# Altium PCB POD-Design-v1.0.PcbDoc (part 6 of 8)
Units mil, origin at the board's own origin, x right, y up, seen from the top; angles counter-clockwise.
Board outline 5511.81 x 3937.01 mil, 4 copper layers (Top Layer, Layer 1, Layer 2, Bottom Layer), stack 61.653 mil thick; 347 components, 252 nets, 1015 pads, 412 vias.
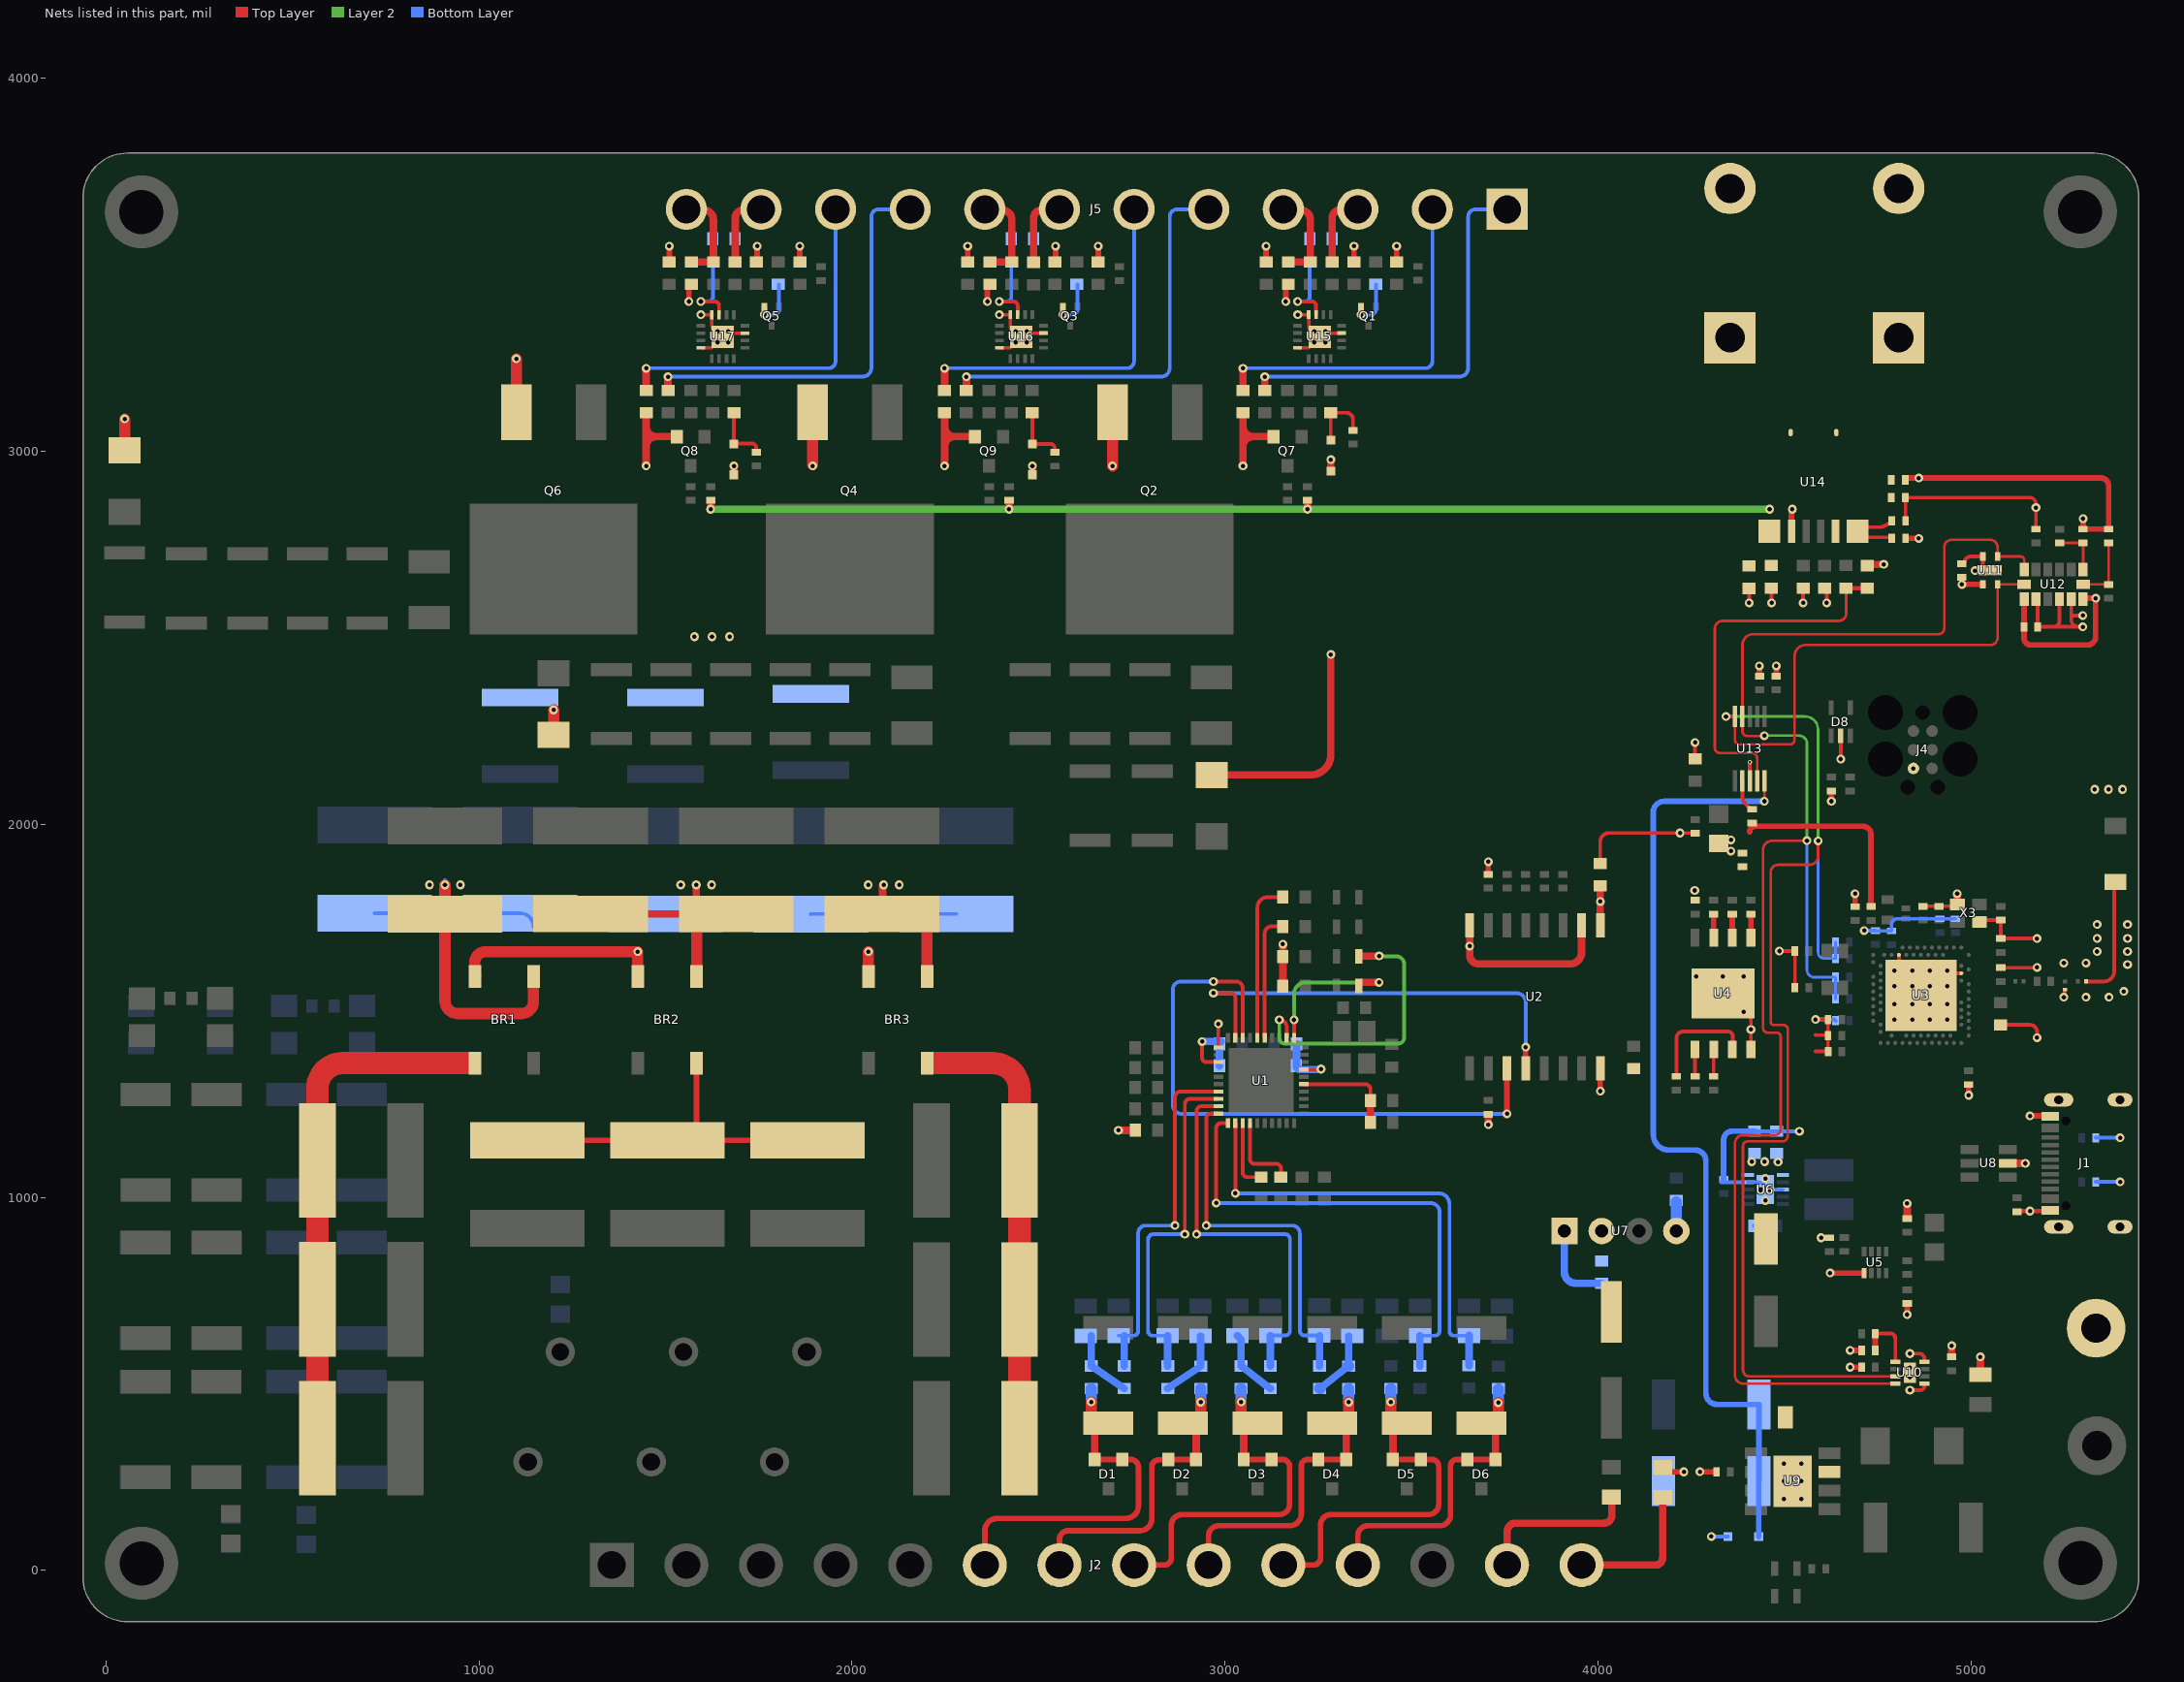
[diagram p4: the nets of this part, all layers, seen from the top]

## Via types
v1: diameter 23.62, hole 11.81, Top Layer to Bottom Layer, tented both sides, 381 vias
v2: diameter 11.81, hole 5.91, Top Layer to Bottom Layer, tented both sides, 30 vias
v3: diameter 15.75, hole 5.91, Top Layer to Bottom Layer, tented both sides, 1 vias

## Nets (pads, with @x,y where several pads share a name; then routed paths per layer and width w, separated by ;. In a path a pad name is that pad's centre, name@x,y a point inside that pad or via, vN(x,y) a via of type N, cw(c..) or ccw(c..) an arc to the next point about the centre after c; other vN are vias at no path point) (continued)
NetC5_2: (continued)
  Bottom Layer w20: C5.2@3033.16,629.41 3043.16,619.41 R9.2@3043.16,548.27 3050.66,543.27 3114.08,493.28 R10.1@3121.58,488.28
NetC7_1: C7.1 R13.2 R14.1 | length 180.3
  Bottom Layer w20: R14.1@3255.67,488.28 R13.2@3329.07,547.25 ; R13.2@3331.57,547.25 C7.1@3331.57,628.39
  Bottom Layer w30: R14.1@3253.17,488.28 R14.1@3255.67,488.28 ; R13.2@3329.07,547.25 R13.2@3331.57,547.25